# Altium PCB AirBnB-v1.0.PcbDoc (part 4 of 6)
Units mil, origin at the board's own origin, x right, y up, seen from the top; angles counter-clockwise.
Board outline 3937 x 3937 mil, 4 copper layers (Top Layer, Signal + GND, Signal + 3v3, Bottom Layer), stack 62.417 mil thick; 240 components, 168 nets, 829 pads, 395 vias.
Unrouted connection lines stored in the file: 6.
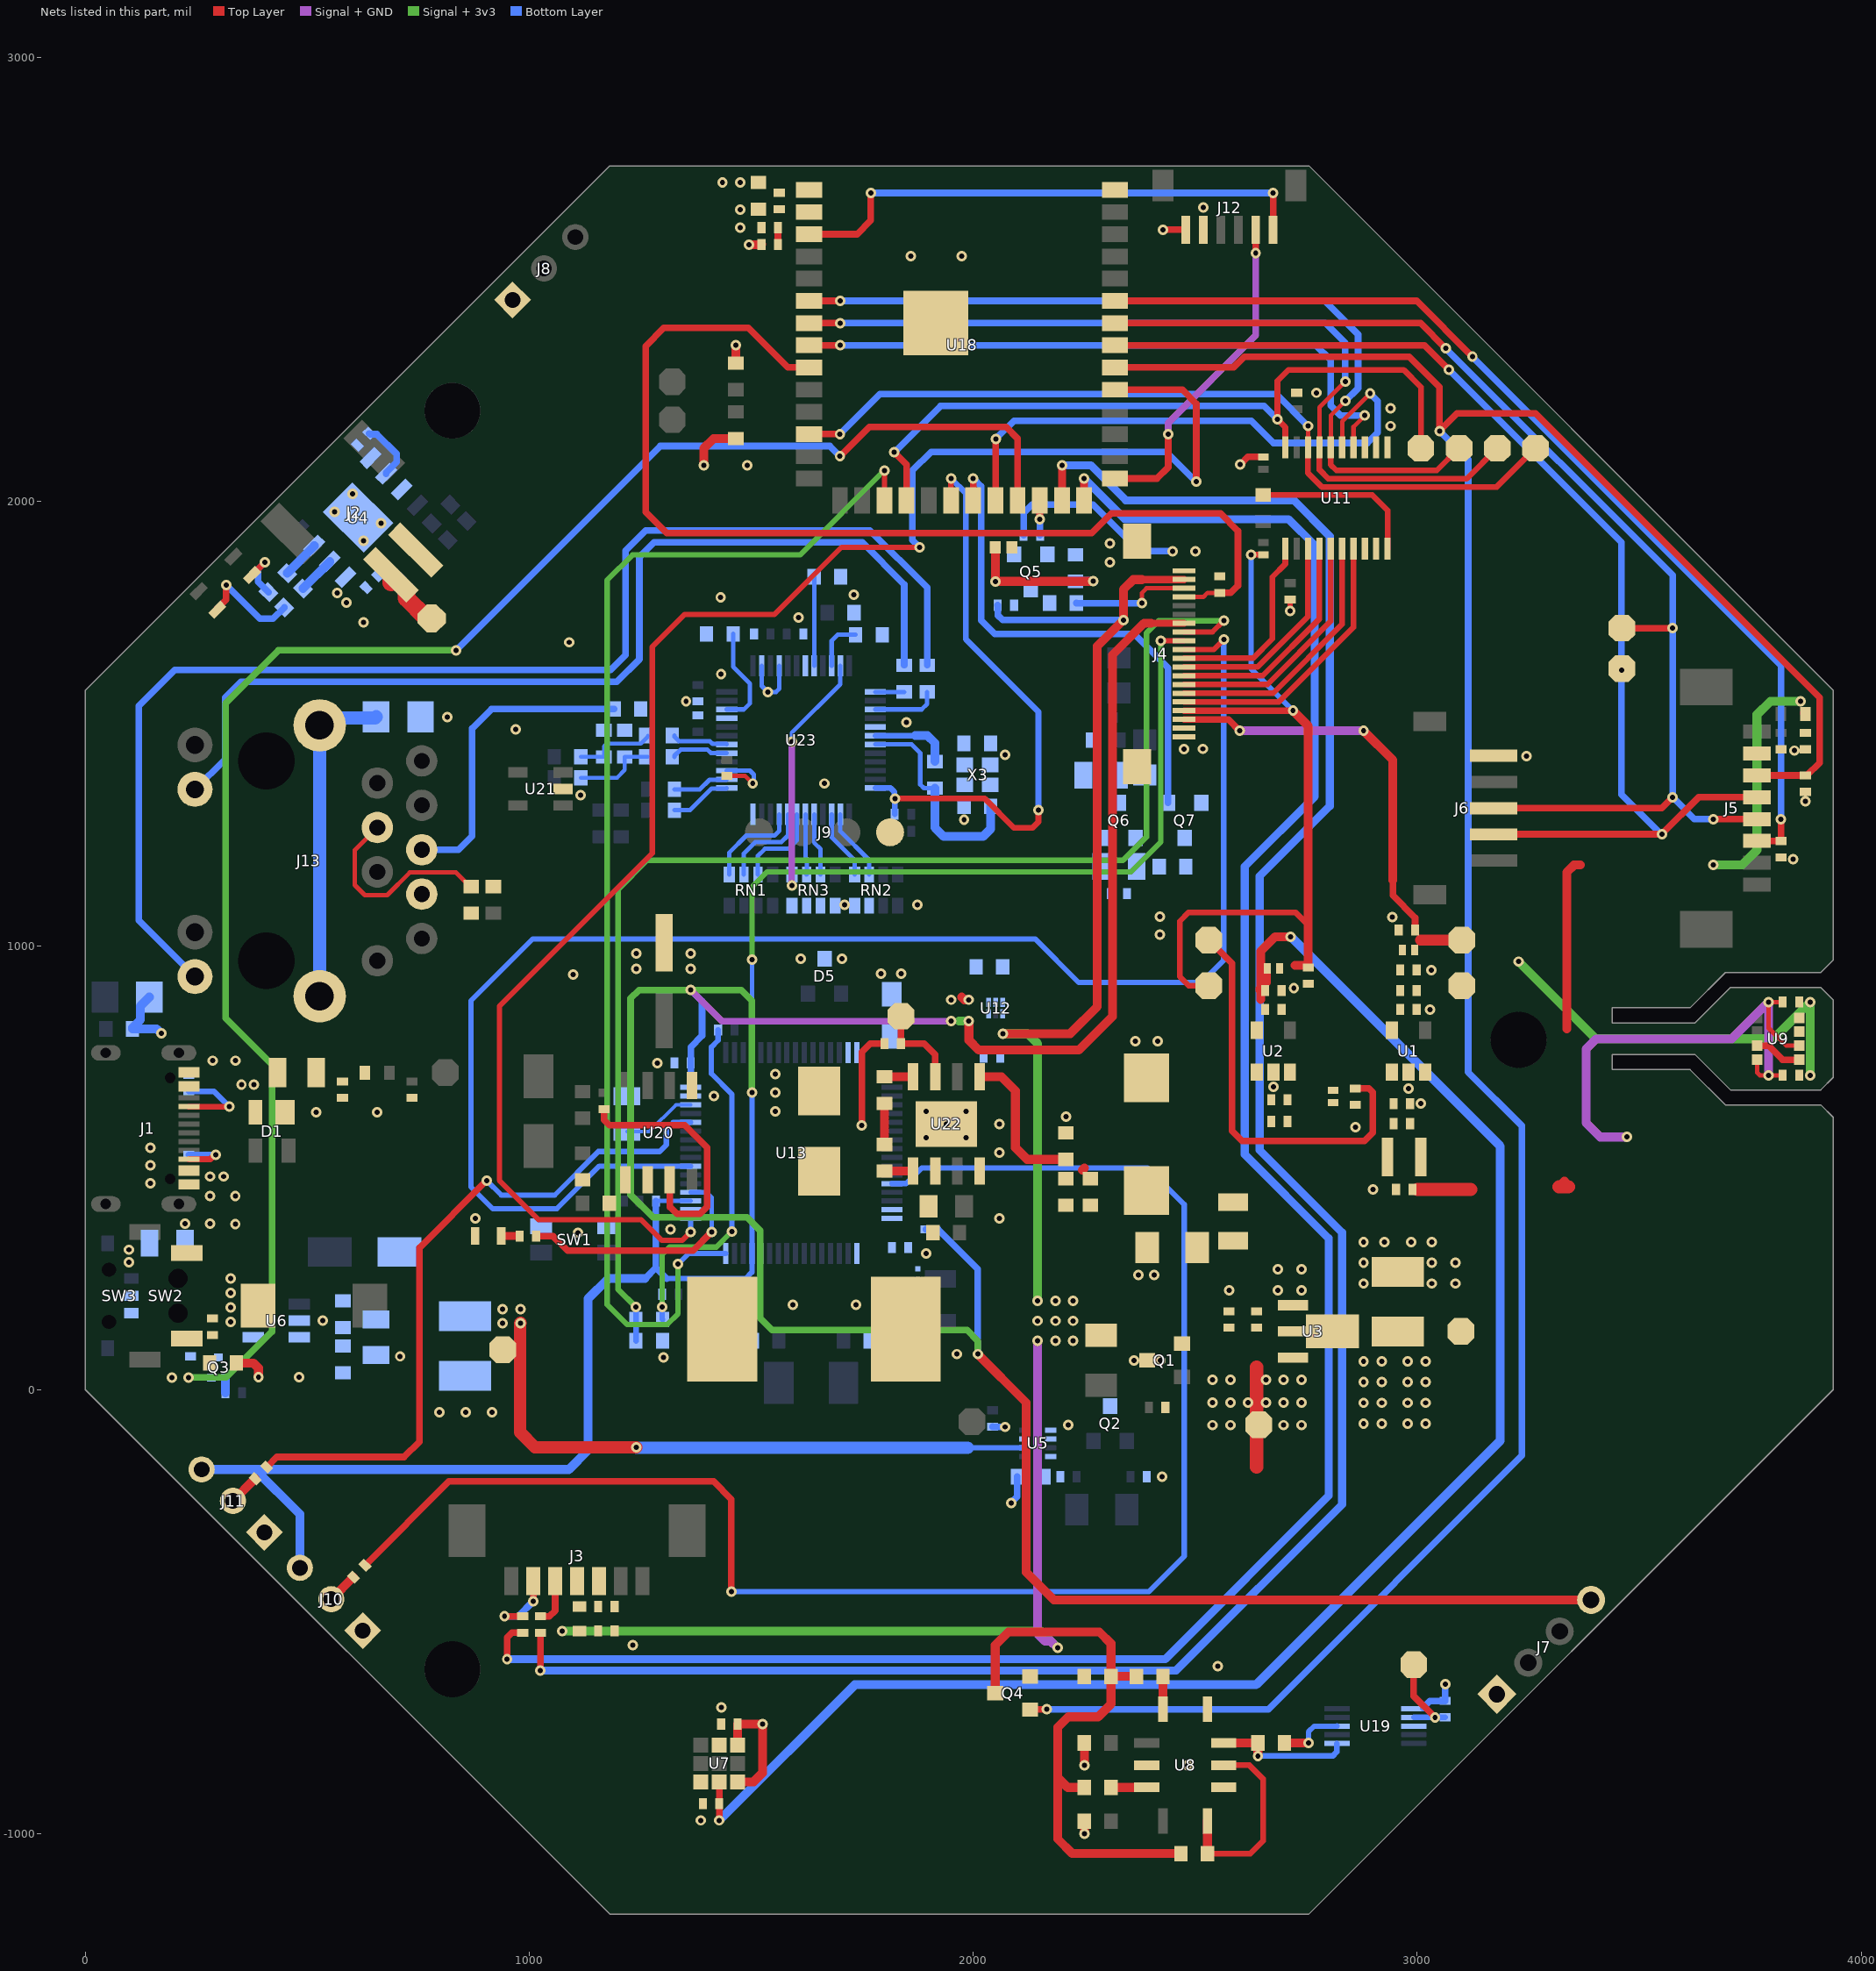
[diagram p4: the nets of this part, all layers, seen from the top]

## Part data (continued)
R67: library part RC0603FR-0712K4L, "RES SMD 12.4K OHM 1% 1/10W 0603", Case Code (Imperial)=0603, Case Code (Metric)=1608, LCSC Part Number=C137798, Manufacturer=Yageo, Max Operating Temperature=155°C, Max Power Dissipation=100mW, Min Operating Temperature=-55°C, Package Quantity=1, Resistance=12.4kR, Resistor Type="Thick Film", Supplier Part Number 1=311-12.4KHRCT-ND, Temperature Coefficient=100ppm/°C, Tolerance=1%, Voltage Rating=50V, Working Voltage=75V, Case/Package=0603, Category="Chip SMD Resistors", ComponentLink1Description=https://datasheet.ciiva.com/2454/pyu-r-int-thick-7-2454069.pdf?src-supplier=Digi-Key, ComponentLink1URL=https://datasheet.ciiva.com/2454/pyu-r-int-thick-7-2454069.pdf?src-supplier=Digi-Key, ComponentLink2Description=https://datasheet.ciiva.com/2454/pyu-r-int-thick-7-2454070.pdf?src-supplier=Digi-Key, ComponentLink2URL=https://datasheet.ciiva.com/2454/pyu-r-int-thick-7-2454070.pdf?src-supplier=Digi-Key, ComponentLink3Description=https://datasheet.ciiva.com/2454/pyu-r-int-thick-7-2454071.pdf?src-supplier=Digi-Key, ComponentLink3URL=https://datasheet.ciiva.com/2454/pyu-r-int-thick-7-2454071.pdf?src-supplier=Digi-Key, Construction=Rectangular, Depth=0.8mm, Features="Moisture Resistant", Height=0.022inch, Lead Free="Lead Free", Length=0.063inch, Manufacturer Part Number=RC0603FR-0712K4L, Military Standard=Not, Number of Terminations=2, Packaging="Tape and Reel", Power Rating=100mW, Pricing 1="1=0.10000, 10=0.02400, 100=0.00970, 1000=0.00436, 2500=0.00378 (USD)", RoHS=Yes, RoHS Compliant=Yes, Series=RC, Stock 1=494008, Supplier 1=Digi-Key, Technology="THICK FILM", Termination=SMD/SMT, Voltage Rating (DC)=50V, Width=0.031inch
RN1 RN2 RN3: library part YC164-FR-0710KL, "RES ARRAY 4 RES 10K OHM 1206", Case Code (Imperial)=1206, Case Code (Metric)=3216, LCSC Part Number=C110924, Manufacturer=Yageo, Max Operating Temperature=155°C, Min Operating Temperature=-55°C, Number of Resistors=4, Power Per Element=62.5mW, Resistance Tolerance=1%, Supplier Part Number 1=5054288, Temperature Coefficient=200ppm/°C, Voltage Rating=50V, Category="Resistor Arrays", Circuit Type=Isolated, ComponentLink1Description=http://www.farnell.com/datasheets/2167431.pdf?src-supplier=Farnell, ComponentLink1URL=http://www.farnell.com/datasheets/2167431.pdf?src-supplier=Farnell, ComponentLink2Description=https://media.digikey.com/pdf/Data%20Sheets/Yageo%20PDFs/YC102-358,TC122-164_Series_DS.pdf?src-supplier=Digi-Key, ComponentLink2URL=https://media.digikey.com/pdf/Data%20Sheets/Yageo%20PDFs/YC102-358,TC122-164_Series_DS.pdf?src-supplier=Digi-Key, ComponentLink3Description=http://www.farnell.com/datasheets/2167431.pdf?src-supplier=Element14, ComponentLink3URL=http://www.farnell.com/datasheets/2167431.pdf?src-supplier=Element14, ComponentLink4Description=http://www.farnell.com/datasheets/443424.pdf?src-supplier=Element14, ComponentLink4URL=http://www.farnell.com/datasheets/443424.pdf?src-supplier=Element14, ComponentLink5Description=http://www.farnell.com/datasheets/2167431.pdf?src-supplier=Newark, ComponentLink5URL=http://www.farnell.com/datasheets/2167431.pdf?src-supplier=Newark, Height=0.028inch, Item Type="Resistor Array", Lead Free="Lead Free", Length=0.126inch, Manufacturer Part Number=YC164-FR-0710KL, Mounting Technology="Surface Mount", Number of Circuits=4, Number of Elements=4, Packaging="Tape and Reel", Pins=8, Pricing 1="5000=0.0101, 20000=0.0095, 50000=0.0092, 125000=0.0089, 200000=0.0085 (USD)", Reach SVHC Compliant=Unknown, RoHS=Yes, RoHS Compliant=Yes, Series=YC164, Stock 1=25000, Supplier 1="Future Electronics", Tolerance=1%, Width=0.063inch
SB1 SB2 SB5 SB6: "Solder Bridge ON", Item Type="Solder Bridge", Manufacturer Part Number="Solder Bridge 0402"
SB3 SB4: "Solder Bridge ON", Manufacturer Part Number="Solder Bridge", Item Type="Solder Bridge"
SW1: "3mm 2mm Round Button 50mA Top3.65mm SPST 12V SMD Tactile Switches", LCSC Part Number=C318893, Manufacturer=XKB, ComponentLink1Description=LCSC, ComponentLink1URL=https://lcsc.com/product-detail/Tactile-Switches_XKB-Connectivity-TS-1185EC-C-D-B_C318893.html, Manufacturer Part Number=TS-1185EC-C-D-B
SW2: "50mA 100MΩ 100000 Times 260gf@±50gf 12V Surface Mount SPST SMD Tactile Switches ROHS", LCSC Part Number=C5381384, Manufacturer="ROCPU Switch", Package=SMD, ComponentLink1Description=LCSC, ComponentLink1URL=https://www.lcsc.com/product-detail/Tactile-Switches_ROCPU-Switches-TP12422673_C5381384.html, Item Type="Tactile Switch", Manufacturer Part Number=TP12422673
SW3: "Surface Mount 1A SPDT 6V Black 10000次 SMD Slide Switches ROHS", LCSC Part Number=C778185, Manufacturer=G-Switch, Package=SMD, ComponentLink1Description=LCSC, ComponentLink1URL=https://www.lcsc.com/product-detail/Slide-Switches_G-Switch-MK-11C04-G013_C778185.html, Item Type="Slide Switche", Manufacturer Part Number=MK-11C04-G013
U1: "300mA 80dB@(1kHz) 305mV@(300mA) Fixed 3.3V~3.3V Positive 1 5.5V SOT-25-5 Linear Voltage Regulators (LDO) ROHS", LCSC Part Number=C69841, Manufacturer="Torex Semicon", Package=SOT-25-5, ComponentLink1Description=LCSC, ComponentLink1URL=https://www.lcsc.com/product-detail/Linear-Voltage-Regulators-LDO_Torex-Semicon-XC6228D332VR-G_C69841.html, Item Type=IC, Manufacturer Part Number=XC6228D332VR-G
U2: "300mA 80dB@(1kHz) 410mV@(300mA) Fixed 1.8V~1.8V Positive 1 5.5V SOT-25-5 Linear Voltage Regulators (LDO) ROHS", LCSC Part Number=C216644, Manufacturer="Torex Semicon", Package=SOT-25-5, ComponentLink1Description=LCSC, ComponentLink1URL=https://www.lcsc.com/product-detail/Linear-Voltage-Regulators-LDO_Torex-Semicon-XC6228D182VR-G_C216644.html, Item Type=IC, Manufacturer Part Number=XC6228D182VR-G
U3: "75dB@(120Hz) 1A Fixed 3.3V~3.3V Positive 15V SOT-89-3 Linear Voltage Regulators (LDO) ROHS", LCSC Part Number=C81768, Manufacturer=UTC, Package=SOT-89-3, ComponentLink1Description=LCSC, ComponentLink1URL=https://www.lcsc.com/product-detail/Linear-Voltage-Regulators-LDO_UTC-Unisonic-Tech-LD1117AG-33-AB3-A-R_C81768.html, Item Type=IC, Manufacturer Part Number=LD1117AG-33-AB3-A-R
U4: "ESOP-8 Battery Management ICs ROHS", LCSC Part Number=C16581, Manufacturer=TOPPOWER, Package=ESOP-8, ComponentLink1Description=LCSC, ComponentLink1URL=https://www.lcsc.com/product-detail/Battery-Management-ICs_TOPPOWER-Nanjing-Extension-Microelectronics-TP4056-42-ESOP8_C16581.html, Item Type=Mosfet, Manufacturer Part Number=TP4056-42-ESOP8
U5: "1.6-V TO 5.5-V, 40-M, 2.5-A, LOW", LCSC Part Number=C3235557, Manufacturer="Texas Instruments", Supplier Part Number 1=595-TPS2116DRLR, Category="Voltage Supervisors", ComponentLink1Description=LCSC, ComponentLink1URL=https://www.lcsc.com/product-detail/Power-Distribution-Switches_Texas-Instruments-TPS2116DRLR_C3235557.html, Item Type=IC, Manufacturer Part Number=TPS2116DRLR, Pricing 1="1=0.9, 10=0.814, 50=0.772, 100=0.634, 1000=0.414, 10000=0.363 (USD)", RoHS=Yes, Stock 1=27931, Supplier 1=Mouser
U6: "boost converterType 1 Boost 28V 2V~24V 1.2MHz SOT-23-6 DC-DC Converters ROHS", LCSC Part Number=C84817, Manufacturer="XI'AN Aerosemi Tech", Package=SOT-23-6, ComponentLink1Description=LCSC, ComponentLink1URL=https://www.lcsc.com/product-detail/DC-DC-Converters_XI-AN-Aerosemi-Tech-MT3608_C84817.html, Item Type=IC, Manufacturer Part Number=MT3608
U7: "Digital Metal-Oxide Multi-Gas Sensor", LCSC Part Number=C3659333, Manufacturer=ScioSense, Supplier Part Number 1=135-ENS160-BGLT, Category=Uncategorized, Item Type="Gas Sensor", Manufacturer Part Number=ENS160-BGLT, Pricing 1="1=12.8, 10=10.46, 50=9.67, 100=8.1, 1000=7.19, 10000=7.19 (USD)", RoHS=No, Stock 1=5978, Supplier 1=Mouser
U8: "CO/NO2/NH3 Triple Gas Sensor Metaloxide Gas Detection Sensor SMD T/R", LCSC Part Number=C3659383, Manufacturer=Amphenol, Category=Sensors, Item Type="(CO) Sensor", Manufacturer Part Number=MICS-6814, Pricing 1="1=10.8025, 10=10.7911 (USD)", RoHS=No, Stock 1=100, Supplier 1="Arrow Electronics", Supplier Part Number 1=MICS-6814
U9: "SENSOR RH PRESSURE TEMP VOC", LCSC Part Number=C125972, Manufacturer="Bosch Sensortec", Max Operating Temperature=85°C, Min Operating Temperature=-40°C, Supplier Part Number 1=7107186, Category=Uncategorized, ComponentLink1Description=https://ae-bst.resource.bosch.com/media/_tech/media/application_notes/BST-BME680-HS000-05.pdf?src-supplier=Digi-Key, ComponentLink1URL=https://ae-bst.resource.bosch.com/media/_tech/media/application_notes/BST-BME680-HS000-05.pdf?src-supplier=Digi-Key, ComponentLink2Description=https://ae-bst.resource.bosch.com/media/_tech/media/product_flyer/BST-BME680-FL000.pdf?src-supplier=Digi-Key, ComponentLink2URL=https://ae-bst.resource.bosch.com/media/_tech/media/product_flyer/BST-BME680-FL000.pdf?src-supplier=Digi-Key, Item Type="Temperature Sensor", Manufacturer Part Number=BME680, Output Type=SPI,I2C, Pricing 1="1=9.84000, 20=8.81000, 125=8.18000, 500=7.71000, 3000=7.09000 (USD)", RoHS=No, Sensor Type=Temperature, Stock 1=64, Supplier 1="Future Electronics"
U11: "IC TRANSLATOR BIDIR 20TSSOP", LCSC Part Number=C17206, Manufacturer="Texas Instruments", Package=20-TSSOP, ComponentLink1Description=LCSC, ComponentLink1URL=https://www.lcsc.com/product-detail/Translators-Level-Shifters_Texas-Instruments-TXS0108EPWR_C17206.html, Item Type=IC, Manufacturer Part Number=TXS0108EPWR
U12: "IC REG LINEAR 3.3V 200MA 6DFN", Case/Package=DFN, Dropout Voltage=150mV, LCSC Part Number=C2971162, Manufacturer=STMicroelectronics, Max Operating Temperature=125°C, Max Output current=200mA, Max Supply Voltage=5.5V, Min Input Voltage=1.9V, Min Operating Temperature=-40°C, Nominal Output Voltage=3.3V, Operating Supply Current=50uA, Package Quantity=6000, Power Supply Rejection Ratio (PSRR)=55dB, Quiescent Current=60uA, Supplier Part Number 1=511-LDK120PU33R, Accuracy=2%, Category="Voltage Regulators - Linear", ComponentLink1Description=https://datasheet.ciiva.com/48475/dm00070790-48475005.pdf?src-supplier=Avnet, ComponentLink1URL=https://datasheet.ciiva.com/48475/dm00070790-48475005.pdf?src-supplier=Avnet, Height=0.45mm, Item Type=IC, Lead Free="Lead Free", Length=1.3mm, Manufacturer Part Number=LDK120PU33R, Mounting Technology="Surface Mount", Number of Outputs=1, Number of Regulators=1, Output Current=200mA, Output Type=Fixed, Output Voltage=3.3V, Packaging="Tape and Reel", Pins=6, Polarity=Positive, Pricing 1="1=0.91, 10=0.752, 50=0.752, 100=0.614, 1000=0.388, 10000=0.343 (USD)", Radiation Hardening=No, Reach SVHC Compliant=No, RoHS=Yes, RoHS Compliant=Yes, Series=-, Stock 1=1169, Supplier 1=Mouser, Width=1.2mm
U13: "IC MCU 32BIT 256KB FLASH 64LQFP", Case/Package=LQFP, Frequency=180MHz, LCSC Part Number=C915971, Manufacturer=STMicroelectronics, Max Supply Voltage=3.6V, Min Supply Voltage=1.7V, Supplier Part Number 1=511-STM32F446RCT6, Category=Microcontrollers, ComponentLink1Description=http://www.farnell.com/datasheets/2309063.pdf?src-supplier=Farnell, ComponentLink1URL=http://www.farnell.com/datasheets/2309063.pdf?src-supplier=Farnell, ComponentLink2Description=http://www.mouser.com/ds/2/389/stm32f446mc-956216.pdf?src-supplier=Mouser, ComponentLink2URL=http://www.mouser.com/ds/2/389/stm32f446mc-956216.pdf?src-supplier=Mouser, ComponentLink3Description=http://www.farnell.com/datasheets/2309063.pdf?src-supplier=Element14, ComponentLink3URL=http://www.farnell.com/datasheets/2309063.pdf?src-supplier=Element14, ComponentLink4Description=http://www.st.com/content/ccc/resource/technical/document/errata_sheet/c3/6b/f8/32/fc/01/48/6e/DM00155929.pdf/files/DM00155929.pdf/jcr:content/translations/en.DM00155929.pdf?src-supplier=Digi-Key, ComponentLink4URL=http://www.st.com/content/ccc/resource/technical/document/errata_sheet/c3/6b/f8/32/fc/01/48/6e/DM00155929.pdf/files/DM00155929.pdf/jcr:content/translations/en.DM00155929.pdf?src-supplier=Digi-Key, ComponentLink5Description=http://www.farnell.com/datasheets/2309063.pdf?src-supplier=Newark, ComponentLink5URL=http://www.farnell.com/datasheets/2309063.pdf?src-supplier=Newark, ComponentLink6Description=http://www.st.com/st-web-ui/static/active/en/resource/technical/document/datasheet/DM00141306.pdf?src-supplier=Avnet, ComponentLink6URL=http://www.st.com/st-web-ui/static/active/en/resource/technical/document/datasheet/DM00141306.pdf?src-supplier=Avnet, Item Type=IC, Lead Free="Lead Free", Manufacturer Part Number=STM32F446RCT6, Memory Size=256KB, Number of I/Os=50, Pins=64, Pricing 1="1=10.62, 10=9.6, 50=8.98, 100=7.95, 1000=6.28, 10000=6.28 (USD)", RAM Size=128KB, Reach SVHC Compliant=No, RoHS=Yes, RoHS Compliant=Yes, Stock 1=998, Supplier 1=Mouser
U18: "SMD MODULE, ESP32-S3R8 WITH 3.3V", LCSC Part Number=C2913202, Manufacturer="Espressif Systems", Supplier Part Number 1=1965-ESP32-S3-WROOM-1-N16R8CT-ND, Category=Uncategorized, ComponentLink1Description=LCSC, ComponentLink1URL=https://www.lcsc.com/product-detail/WiFi-Modules_Espressif-Systems-ESP32-S3-WROOM-1-N16R8_C2913202.html, Item Type=Module, Manufacturer Part Number=ESP32-S3-WROOM-1-N16R8, Pricing 1="1=4.29000 (USD)", RoHS=No, Stock 1=423, Supplier 1=Digi-Key
U19: "IC ADC 12BIT SIGMA-DELTA 10VSSOP", Case/Package=VSSOP, LCSC Part Number=C193969, Manufacturer="Texas Instruments", Max Operating Temperature=125°C, Max Supply Voltage=5.5V, Min Operating Temperature=-40°C, Min Supply Voltage=2V, Operating Supply Voltage=3.3V, Package Quantity=2500, Power Dissipation=900uW, Supplier Part Number 1=296-41185-1-ND, Category="Analog to Digital Converters (ADCs)", ComponentLink1Description=https://datasheet.ciiva.com/14260/sbas473c-14260076.pdf?src-supplier=Avnet, ComponentLink1URL=https://datasheet.ciiva.com/14260/sbas473c-14260076.pdf?src-supplier=Avnet, ComponentLink2Description=https://datasheet.ciiva.com/6662/ads1013-6662716.pdf?src-supplier=Digi-Key, ComponentLink2URL=https://datasheet.ciiva.com/6662/ads1013-6662716.pdf?src-supplier=Digi-Key, Contact Plating=Gold, Conversion Rate=3.3KS/s, Integral Nonlinearity (INL)=0.5LSB, Interface=I2C, Item Type=IC, Lead Free="Lead Free", Manufacturer Part Number=ADS1015IDGSR, Max Supply Voltage (DC)=5.5V, Min Supply Voltage (DC)=2V, Number of A/D Converters=1, Number of Bits=12, Number of Converters=1, Number of Elements=1, Number of Inputs=4, Number of Pins=10, Packaging="Tape and Reel", Polarity=Bipolar, Pricing 1="1=3.09000, 10=2.77500, 25=2.62360, 100=2.27370, 250=2.15712, 500=1.93556, 1000=1.65000 (USD)", Radiation Hardening=No, Reach SVHC Compliant=Yes, Resolution=12b, RoHS=Yes, RoHS Compliant=Yes, Sampling Rate=3.3KS/s, Series=-, Supplier 1=Digi-Key, Supply Type=Single
U20: "IC POE CNTRL 1 CHANNEL 8SOIC", Case/Package=D, LCSC Part Number=C2867397, Manufacturer="Texas Instruments", Max Operating Temperature=85°C, Max Power Dissipation=12.95W, Max Supply Voltage=57V, Min Current Limit=405mA, Min Operating Temperature=-40°C, Min Supply Voltage=0V, Operating Supply Current=240uA, Output Current=450mA, Package Quantity=2500, Power Dissipation=13W, Supplier Part Number 1=595-TPS2375DR, Category="Interface ICs", ComponentLink1Description=https://datasheet.ciiva.com/1943/tps2375-1943071.pdf?src-supplier=Digi-Key, ComponentLink1URL=https://datasheet.ciiva.com/1943/tps2375-1943071.pdf?src-supplier=Digi-Key, ComponentLink2Description=https://datasheet.ciiva.com/1943/tps2375-1943070.pdf?src-supplier=Digi-Key, ComponentLink2URL=https://datasheet.ciiva.com/1943/tps2375-1943070.pdf?src-supplier=Digi-Key, ComponentLink3Description=https://datasheet.ciiva.com/1943/tps2375-1943072.pdf?src-supplier=Digi-Key, ComponentLink3URL=https://datasheet.ciiva.com/1943/tps2375-1943072.pdf?src-supplier=Digi-Key, ComponentLink4Description=https://datasheet.ciiva.com/14248/tps2375-14248055.pdf?src-supplier=Avnet, ComponentLink4URL=https://datasheet.ciiva.com/14248/tps2375-14248055.pdf?src-supplier=Avnet, Height=1.58mm, Item Type=IC, Lead Free="Lead Free", Length=5mm, Manufacturer Part Number=TPS2375DR, Number of Channels=1, Packaging="Tape and Reel", Pins=8, Pricing 1="1=2.94, 10=2.65, 50=2.5, 100=2.13, 1000=1.45, 10000=1.29 (USD)", Radiation Hardening=No, RoHS=Yes, RoHS Compliant=Yes, Series=-, Stock 1=12566, Supplier 1=Mouser, Weight=0.002561oz
U21: "TVS DIODE 5.5VWM 8.5VC SOT23-5", Breakdown Voltage=5.5V, Case/Package=SOT-23, Clamping Voltage=7.8V, Clamping Voltage-Max=8V, LCSC Part Number=C10675, Leakage Current=100nA, Manufacturer=Littelfuse, Max Operating Temperature=85°C, Max Power Dissipation=225mW, Min Operating Temperature=-40°C, Power Line Protection=No, Supplier Part Number 1=3283009, Voltage Rating (DC)=5V, Category="TVS Diodes", ComponentLink1Description=https://datasheet.ciiva.com/15143/getdatasheetpartid-152299-15143806.pdf?src-supplier=Verical, ComponentLink1URL=https://datasheet.ciiva.com/15143/getdatasheetpartid-152299-15143806.pdf?src-supplier=Verical, ComponentLink2Description=https://datasheet.ciiva.com/4509/sp05x-leadfree-4509638.pdf?src-supplier=Mouser, ComponentLink2URL=https://datasheet.ciiva.com/4509/sp05x-leadfree-4509638.pdf?src-supplier=Mouser, ComponentLink3Description=https://datasheet.ciiva.com/22697/1911798-22697943.pdf?src-supplier=Element14, ComponentLink3URL=https://datasheet.ciiva.com/22697/1911798-22697943.pdf?src-supplier=Element14, ComponentLink4Description=https://datasheet.ciiva.com/8062/littefuse-spa-sp050x-8062425.pdf?src-supplier=Element14, ComponentLink4URL=https://datasheet.ciiva.com/8062/littefuse-spa-sp050x-8062425.pdf?src-supplier=Element14, ComponentLink5Description=https://datasheet.ciiva.com/332/sp05xxba-332619.pdf?src-supplier=Digi-Key, ComponentLink5URL=https://datasheet.ciiva.com/332/sp05xxba-332619.pdf?src-supplier=Digi-Key, ComponentLink6Description=https://datasheet.ciiva.com/332/sp05xxba-332620.pdf?src-supplier=Digi-Key, ComponentLink6URL=https://datasheet.ciiva.com/332/sp05xxba-332620.pdf?src-supplier=Digi-Key, ComponentLink7Description=https://datasheet.ciiva.com/16393/sp05xxba-16393404.pdf?src-supplier=Future+Electronics, ComponentLink7URL=https://datasheet.ciiva.com/16393/sp05xxba-16393404.pdf?src-supplier=Future+Electronics, ComponentLink8Description=https://datasheet.ciiva.com/332/sp05xxba-332621.pdf?src-supplier=Digi-Key, ComponentLink8URL=https://datasheet.ciiva.com/332/sp05xxba-332621.pdf?src-supplier=Digi-Key, ComponentLink9Description=https://datasheet.ciiva.com/1268/526672-1268494.pdf?src-supplier=Element14, ComponentLink9URL=https://datasheet.ciiva.com/1268/526672-1268494.pdf?src-supplier=Element14, Depth=1.75mm, Diode Type=ZENER, Direction=Unidirectional, ESD Protection=Yes, Height=1.3mm, Item Type="TVS Diode", Lead Free="Lead Free", Length=3.05mm, Manufacturer Part Number=SP0504BAHTG, Max Reverse Leakage Current=100nA, Mounting Technology="Surface Mount", Number of Channels=4, Number of Elements=4, Number of Unidirectional Channels=4, Packaging="Tape and Reel", Peak Pulse Power=225mW, Pins=5, Polarity=Bidirectional,Unidirectional, Power Dissipation=225mW, Pricing 1="1=0.78, 15=0.685, 75=0.625, 300=0.575, 1500=0.52 (USD)", Radiation Hardening=No, Reach SVHC Compliant=Unknown, Reverse Standoff Voltage=5.5V, RoHS=Yes, RoHS Compliant=Yes, Series="SP05, SPA®", Stock 1=1611, Supplier 1="Future Electronics", Termination=SMD/SMT, Width=1.75mm, Working Voltage=5.5V
U22: "Step-down type SOIC-8-EP DC-DC Converters ROHS", LCSC Part Number=C329267, Manufacturer=XDS, Package=SOIC-8-EP, ComponentLink1Description=LCSC, ComponentLink1URL=https://www.lcsc.com/product-detail/DC-DC-Converters_XDS-TX4138_C329267.html, Item Type=IC, Manufacturer Part Number=TX4138
U23: "SPI LQFP-48(7x7) Ethernet ICs ROHS", LCSC Part Number=C32843, Manufacturer=WIZNET, Package=LQFP-48(7x7), ComponentLink1Description=LCSC, ComponentLink1URL=https://www.lcsc.com/product-detail/Ethernet-ICs_WIZNET-W5500_C32843.html, Item Type=IC, Manufacturer Part Number=W5500
X1: library part DXTF321532768C10F, "32.768kHz 7pF ±10ppm SMD3215-2P Crystals ROHS", LCSC Part Number=C5830643, Manufacturer=Shenzhen, Package=SMD3215-2P, ComponentLink1Description=LCSC, ComponentLink1URL=https://www.lcsc.com/product-detail/Crystals_Shenzhen-SCTF-Elec-DXTF321532768C10F_C5830643.html, Item Type=Crystal, Manufacturer Part Number=DXTF321532768C10F
X2: library part X50328MSB2GI, "8MHz 20pF ±10ppm ±50ppm SMD5032-2P Crystals ROHS", LCSC Part Number=C115962, Manufacturer="Yangxing Tech", Package=SMD5032-2P, ComponentLink1Description=LCSC, ComponentLink1URL=https://www.lcsc.com/product-detail/Crystals_Yangxing-Tech-X50328MSB2GI_C115962.html, Item Type=Crystal, Manufacturer Part Number=X50328MSB2GI
X3: library part Q22FA12800090, "CRYSTAL 25.0000MHZ 12PF SMD", LCSC Part Number=C255883, Manufacturer="Seiko Epson", Package=SMD2016-4P, ComponentLink1Description=LCSC, ComponentLink1URL=https://www.lcsc.com/product-detail/Crystals_Seiko-Epson-Q22FA12800090_C255883.html, Item Type=Crystal, Manufacturer Part Number=Q22FA12800090

## Free pads (board coordinates)
  round 125.98 hole 125.98 unplated: MH(826.77,2204.72) MH1(826.77,-629.92) MH2(3228.35,787.4)

## Via types
v1: diameter 23.62, hole 11.81, Top Layer to Bottom Layer, 392 vias
v2: diameter 23.62, hole 11.81, Top Layer to Bottom Layer, tented top, 3 vias

## Nets (pads, with @x,y where several pads share a name; then routed paths per layer and width w, separated by ;. In a path a pad name is that pad's centre, name@x,y a point inside that pad or via, vN(x,y) a via of type N, cw(c..) or ccw(c..) an arc to the next point about the centre after c; other vN are vias at no path point)
1V8: C12.2 C14.2 C27.1 FB4.1 U2.5 U7.4 | length 3774.2
  Top Layer w15: v1(1427.73,-970) C27.1@1427.73,-932.27 U7.4@1427.73,-883.34
  Top Layer w20: 2645.72,899 2647.52,900.81 2645.72,902.61 ; 2647.17,878.58 2647.17,899 2647.17,916.71 2647.17,987.17 2680,1020 v1(2715,1020) ; C14.2@2655,899 2655,916.71 ; 2659.81,916.71 FB4.1@2659.81,948.44
  Bottom Layer w20: v1@1428.22,-969.51 1733.11,-664.62 2636.89,-664.62 3187.01,-114.51 3187.01,547.99 v1(2715,1020)
1V8_SENSOR: C16.2 FB4.2 FB7.1 J4.17 P2.1 | length 1794.3
  Top Layer w13: P2.1@2530,910 2485,910 2465,930 2465,1055 2485,1075 2725.42,1075 2754.72,1045.7 ; v1(2626,1880.31) FB7.1@2653,1880.31
  Top Layer w14: J4.17@2474.76,1529.05 v1(2719.98,1529.02)
  Top Layer w20: v1(2719.98,1529.02) 2754.36,1494.64 C16.2@2754.36,955.49 ; 2724.42,955.49 C16.2@2745.86,955.49 ; C16.2@2742.36,955.49 C16.2@2754.36,955.49 ; C16.2@2754.36,957.7 C16.2@2754.36,955.49
  Bottom Layer w12: v1(2626,1880.31) 2626,1623 v1(2719.98,1529.02)
3V3: C19.1 C24.1 C28.2 C29.2 C58.2 C59.2 C69.2 FB8.1 J4.1 J12.1 P7.1 Q5.1 Q6.2 R13.2 R20.1 R21.1 R22.1 R23.2 R24.2 R25.2 R36.2 R37.2 R38.2 R40.2 R41.1 R44.2 R55.1 R56.2 U3.2 U7.5 U7.7 U9.2 U9.5 U9.6 U9.8 U18.2 U19.1 U19.8 | length 2669.4
  Top Layer w15: v1@1749,595.52 1749,760.5 1767.71,779.21 R56.2@1800.06,779.21 ; v1(2427.39,2612.3) J12.1@2478.58,2612.3 ; v1(2601.04,2083.14) 2601.27,2083.14 2618.69,2100.56 FB8.1@2653,2100.56 ; U9.2@3765.51,774.5 3791.34,774.5 3822.83,743.01 U9.8@3860,743.01
  Top Layer w20: R40.2@340,60 378.28,60 390,48.28 v1(390,27.99) ; v1(1392.72,2081.81) 1392.72,2119.72 1415,2142 R38.2@1465,2142 ; R37.2@1465,2312 v1(1465,2352) ; U7.5@1469.07,-883.34 1505,-883.34 1525,-863.34 v1(1525,-753.27) C24.1@1469.07,-753.27 U7.7@1469.07,-800.66 ; v1(2249.98,-1000.35) R21.1@2249.98,-971.81 ; v1(2249.98,-845.83) R20.1@2249.98,-795.83 ; R22.1@2700.98,-795.83 v1(2755,-795.83)
  Signal + 3v3 w20: v1(3228.35,964) 3402.1,790.25 3802.25,790.25 v1(3885,873) v1(3885,708)
  Bottom Layer w12: v1(2755,-795.83) 2755,-770.57 2767.85,-757.72 2818.91,-757.72 U19.8@2819,-757.63
  Bottom Layer w15: R13.2@2043.39,-83.43 2043.67,-83.71 2071.72,-83.71 v1(2072,-84) ; R41.1@2113.34,1924 2113.34,1974.34 2132,1993 2269.68,1993 2374.5,1888.18 v1(2449.17,1888.18) ; U19.1@3013.27,-716.67 3013.27,-715.67 3028,-700.94 R44.2@3063,-700.94 v1(3063,-663.44)
  other v1: 2879,-76.33 2920,-76.33 2978,-76.33 3019,-76.33 2879,-29.67 2920,-29.67 2978,-29.67 3019,-29.67 2879,17 2920,17 2978,17 3019,17 2879,63.67 2920,63.67 2978,63.67 3019,63.67 1749,595 2420,1065 3846.45,1195 3874.12,1325 2500,1888.18 1475,2617 1475,2657
  other v2: 2420,1025
3V3_AUD: C42.1 C43.1 C45.2 C47.2 J4.7 J7.4 J10.3 J11.3 R27.1 U12.1 U13.1 U13.13 U13.19 U13.32 U13.48 U13.64 | length 9037.6
  Top Layer w16: 2400.74,1725.9 J4.7@2474.76,1725.9
  Top Layer w20: 1973.91,883.91 1979.82,878 v1(1990,878) ; v1(1990,830.18) 1990,786.98 2012.4,764.58 2237.46,764.58 2313.45,840.57 2313.45,1654.91 2384.44,1725.9 2400.74,1725.9 ; v1(2010,80) 2119.11,-29.11 2119.11,-410.87 2181.82,-473.58 J7.4@3391.42,-473.58
  Signal + GND w15: v1(1363.62,900) 1433.62,830 v1@1950,830
  Signal + 3v3 w15: v1(1501.42,669) 1501.42,875.86 1477.28,900 v1(1363.62,900) 1247,900 1228,881 1228,439 1279,388 1490,388 1520,358 1520,160.71 1546.71,134 1986,134 2010,110 v1(2010,80)
  Signal + 3v3 w20: 1968.09,830.18 v1(1990,830.18)
  Bottom Layer w10: R27.1@1285,425 U13.19@1363.35,425
  Bottom Layer w12: 1309.34,250.01 1487.11,250.01 1501.42,264.32 U13.13@1501.42,306.62 v1(1501.42,669)
  Bottom Layer w15: 1260.67,250.01 1285,274.34 ; R27.1@1285,425 1285,274.34 ; 1309.34,250.01 1285,274.34 ; U13.32@1363.62,680.64 C47.2@1363.62,735.76 1363.62,771.61 1389,796.99 1389,874.62 v1(1363.62,900) ; C45.2@1893.27,361 C45.2@1893.22,360.96 1920.92,360.96 2010,271.87 v1(2010,80) ; C45.2@1893.33,360.98 C45.2@1896.7,360.98
  Bottom Layer w20: J11.3@261.75,-179.75 382.29,-179.75 ; J10.3@483.17,-401.17 483.17,-280.63 382.29,-179.75 ; 1260.67,250.01 1177.67,250.01 1132,204.34 1132,-136.8 1089.05,-179.75 382.29,-179.75 ; J7.4@3390.69,-474.31 J7.4@3391.42,-473.58
  other v1: 1950,830.18 1950,878
3V3_CLEAN: C3.2 C9.2 C10.2 C13.2 FB1.1 FB3.1 P4.1 U1.5 | length 919.9
  Top Layer w15: P4.1@2530,1012.2 2582.42,959.78 2582.42,582.61 2605.36,559.68 2880.81,559.68 2899.82,578.69 2899.82,669.17 2890.59,678.41 C3.2@2860.31,678.41
3V3_SENSOR: C15.2 FB3.2 J4.18 P3.1 | length 1003.2
  Top Layer w15: J4.18@2474.76,1509.36 2574.41,1509.36 v1(2600,1483.77) ; 2945,1147.02 2945,1112.78 2995,1062.78 C15.2@2995,1035
  Top Layer w20: v1(2879,1483.77) 2945,1417.77 2945,1147.02
  Top Layer w25: 3007.5,1012.2 P3.1@3100,1012.2
  Signal + GND w20: v1(2600,1483.77) v1@2878.02,1483.77
5V: C1.2 C17.2 C18.2 C26.2 C31.2 C36.2 D2.1 FB5.2 FB6.2 J4.2 L1.1 P6.1 Q1.2 Q4.2 R17.1 R42.1 U3.3 U5.2 U5.7 U12.4 U12.6 | length 5477.7
  Top Layer w16: 2380,1824.32 J4.2@2474.76,1824.32
  Top Layer w20: v1(2066.5,801.81) 2218.15,801.81 2279.26,862.91 2279.26,1674.58 v1@2337.75,1733.07 ; v1(2338,1733.32) 2338,1802.02 2360.3,1824.32 2380,1824.32 ; 3318.95,456.73 3331.34,469.12 ; 3336.5,812.75 3336.5,1164.89 3353,1181.39 3366.78,1181.39 3367.37,1181.98 ; v1@3863.4,1548.97 v1(3863.4,1549.95) ; FB6.2@3872.31,1523.31 FB6.2@3874.12,1521.5
  Top Layer w30: 2638,-174.32 2638,-79 2638,50.53 ; 3000.6,451 3120,451 ; 3318.95,456.73 3331.34,456.73 3340.24,456.73
  Signal + GND w20: v1(2145,110) 2145,-550 2161.1,-566.1 2174.01,-566.1 2189.02,-581.11 v1(2190,-581.11)
  Signal + 3v3 w20: v1(1074,-543.53) 2152.42,-543.53 v1(2190,-581.11) ; v1(2066.5,801.81) 2122.19,801.81 2145,779 v1(2145,200) ; v1(3667,1181.98) 3731.98,1181.98 3765,1215 3765,1520 3794.95,1549.95 v1(3863.4,1549.95)
  Bottom Layer w15: R42.1@2054.76,1766.5 2055.35,1765.91 2055.35,1743.77 2065.8,1733.32 v1(2338,1733.32)
  other v1: 2539,-80 2579,-80 2699,-80 2739,-80 2539,-29 2579,-29 2619,-29 2659,-29 2699,-29 2739,-29 2539,22 2579,22 2659,22 2699,22 2739,22 2185,110 2225,110 2145,155 2185,155 2225,155 2185,200 2225,200
5V_BOOST: C22.2 C23.1 D4.1 P10.1 R15.2 U5.6 | length 1401.3
  Top Layer w28: P10.1@940,90 P10.1@942.5,92.5 ; v1(980,150) 979,149 979,-96 1013,-130 v1(1241,-130)
  Bottom Layer w12: 1987,-130.68 U5.6@2116,-130.68
  Bottom Layer w28: v1(1241,-130) 1241.68,-130.68 1987,-130.68
  other v1: 940,150 940,181 980,181
5V_PoE: D8.1 Q1.3 Q2.3
  other v1: 2362,66 2421.26,66 2372,258 2407,258
W5500_RST: R69.2 U18.19 U23.37 | length 1422.6
  Top Layer w13: v1(1765.43,1296) 1765.43,1345.82 1784.62,1365 2044.89,1365 v1(2105,1304.89) ; U18.19@1899.66,2002.79 v1(1899.66,2052)
  Bottom Layer w13: U23.37@1720.27,1295.68 1720.27,1295.8 1720.47,1296 v1(1765.43,1296) 1804.43,1257 R69.2@1822.9,1257 ; v1(1899.66,2052) 1952,1999.66 1952,1667 2105,1514 v1(2105,1304.89)
#VBUS: D1.2 F1.1 J1.A4/B9 J1.B4/A9
  other v1: 280.62,480 311.1,480 351.5,687 379.5,687
A1: J4.11 U11.1 | length 432.3
  Top Layer w13: J4.11@2474.76,1647.16 2630,1647.16 2673.75,1690.91 2673.75,1830.34 2702.74,1859.34 U11.1@2702.74,1894.09
A2: J4.12 U11.3 | length 479.1
  Top Layer w13: J4.12@2474.76,1627.47 2640.15,1627.47 2753.93,1741.24 U11.3@2753.93,1894.09
A3: J4.13 U11.4 | length 516.2
  Top Layer w13: J4.13@2474.76,1607.79 2651.68,1607.79 2779.52,1735.63 U11.4@2779.52,1894.09
A4: J4.14 U11.5 | length 552.8
  Top Layer w13: J4.14@2474.76,1588.1 2662.56,1588.1 2805.11,1730.64 U11.5@2805.11,1894.09
A5: J4.15 U11.6 | length 590.6
  Top Layer w13: J4.15@2474.76,1568.42 2675.36,1568.42 2830.7,1723.75 U11.6@2830.7,1894.09
A6: J4.16 U11.7 | length 628.4
  Top Layer w13: J4.16@2474.76,1548.73 2688.16,1548.73 2856.29,1716.86 U11.7@2856.29,1894.09
A7: U11.8
A8: U11.9
ADS_RDY: P19.1 R44.1 U19.2 | length 209.6
  Top Layer w15: P19.1@2992,-619 2992,-689.94 v1(3040,-737.94)
  Bottom Layer w13: U19.2@2992.23,-737.94 v1(3040,-737.94) R44.1@3063,-737.94
B1: P18.1 U11.20 U18.18 | length 1682.7
  Top Layer w13: U11.20@2702.74,2122.43 2702.74,2167.26 v1(2685,2185) 2685,2271.65 2710.14,2296.79 2969.1,2296.79 3008,2257.89 P18.1@3008,2120
  Top Layer w15: v1(1822,2111) 1849.83,2083.17 1849.83,2002.96 U18.18@1849.66,2002.79
  Bottom Layer w15: v1(1822,2111) 1926.44,2215.44 2654.56,2215.44 v1(2685,2185)
B2: P17.1 U11.18 U18.12 | length 1857.8
  Top Layer w10: U11.18@2753.93,2122.43 v1(2753.93,2170)
  Top Layer w13: U11.18@2753.93,2122.43 2753.93,2063.95 2784.87,2033 3179,2033 P17.1@3266,2120
  Top Layer w15: U18.12@1629.97,2152 v1(1699.66,2152)
  Bottom Layer w15: v1(1699.66,2152) 1789.34,2241.68 2682.25,2241.68 v1(2753.93,2170)
B3: P16.1 U11.17 U18.7 | length 1973.4
  Top Layer w10: U11.17@2779.52,2122.43 2779.52,2211.73 v1(2837.78,2270)
  Top Layer w13: U11.17@2779.52,2122.43 2779.52,2071.46 2799.47,2051.5 3111.5,2051.5 P16.1@3180,2120
  Top Layer w15: U18.7@1629.97,2402 v1(1700,2402)
  Bottom Layer w15: v1(1700,2402) 2793,2402 2837.78,2357.22 v1(2837.78,2270)
B4: P15.1 U11.16 U18.6 | length 1902.5
  Top Layer w10: U11.16@2805.11,2122.43 2805.11,2193.82 v1(2837.78,2226.5)
  Top Layer w13: U11.16@2805.11,2122.43 2805.11,2082.8 2817.9,2070.01 3044.01,2070.01 P15.1@3094,2120
  Top Layer w15: U18.6@1629.97,2452 v1(1700,2452) ; P15.1@3094,2120 P15.1@3094.5,2120.5
  Bottom Layer w15: v1(1700,2452) 2790.76,2452 2866.66,2376.1 2866.66,2255.38 v1(2837.78,2226.5)
B5: U11.15 U18.22 | length 1277.5
  Top Layer w10: U11.15@2830.7,2122.43 2830.7,2180.35 v1(2893.82,2243.48)
  Top Layer w15: U18.22@2049.66,2002.79 2050.15,2003.28 2050.15,2129.51 v1@2050.65,2130
  Bottom Layer w15: v1(2050.65,2141) 2091.65,2182 2626,2182 2676,2132 2887.63,2132 2910.66,2155.03 2910.66,2226.64 v1(2893.82,2243.48)
B6: U11.14 U18.8 | length 1459.7
  Top Layer w10: U11.14@2856.29,2122.43 2856.29,2168.23 v1(2881.88,2193.82)
  Top Layer w15: U18.8@1629.97,2352 v1(1700,2352)
  Bottom Layer w15: v1(1700,2352) 2771.83,2352 2805,2318.83 2805,2216 2827.17,2193.82 v1(2881.88,2193.82)
B7: U11.13
B8: U11.12
BATT: C20.2 C21.2 J2.2 P8.1 SW3.C U4.5 | length 147.7
  Top Layer w39.37: J2.2@688.4,1817.33 J2.2@688.4,1835 ; J2.2@697.24,1826.17 723.2,1800.21 723.2,1782.53 766.27,1739.45 777.55,1739.45 P8.1@780,1737
  other v1: 98,286.96 98,315.05 588.21,1772.55 567.11,1793.74
BOOT0: R30.2 U13.60 | length 3681
  Top Layer w15: R30.2@629.87,-395.88 819.14,-206.62 1414.83,-206.62 1455,-246.8 v1(1455,-455)
  Bottom Layer w12: v1(1455,-455) 2395,-455 2475,-375 2475,416.96 2392.43,499.53 1884.03,499.53 1848.69,464.2 1816.47,464.2 U13.60@1816.38,464.1
BOOT1: R31.2 U13.28 | length 1580.5
  Top Layer w15: R31.2@408.45,-174.46 431.31,-151.6 718.29,-151.6 752.41,-117.49 752.41,319.41 v1(904,471)
  Bottom Layer w12: v1(904,471) 937,438 1057.21,438 1155.46,536.25 1293.32,536.25 1308.49,551.43 1308.49,586.37 1324.02,601.9 U13.28@1363.62,601.9
CH2O_5V: C25.2 FB5.1 J3.4
CH2O_RX: SB6.1 U18.25 | length 5117.1
  Top Layer w15: v1(1024.79,-632.73) SB6.1@1024.79,-547.46
  Top Layer w18: U18.25@2199.66,2002.79 v1(2199.66,2081.69)
  Bottom Layer w18: v1(1024.79,-632.73) 2456.46,-632.73 2830.59,-258.6 2830.59,353.92 2645,539.51 2645,1156.45 2803,1314.45 2803,1921.48 2721.7,2002.79 2343.52,2002.79 2264.62,2081.69 v1(2199.66,2081.69)
CH2O_TX: SB5.1 U18.26 | length 5004.2
  Top Layer w15: v1@950,-605.48 950,-558 960.54,-547.46 SB5.1@985,-547.46
  Top Layer w18: U18.26@2249.66,2002.79 v1(2249.66,2052)
  Bottom Layer w18: v1(950,-607) 950.08,-606.92 2432.3,-606.92 2800.3,-238.92 2800.3,340.94 2611.3,529.94 2611.3,1178.1 2769,1335.81 2769,1901 2710,1960 2341.66,1960 v1(2249.66,2052)
CO: R22.2 U8.H U19.6 | length 306.5
  Top Layer w20: U8.H@2563.98,-795.83 R22.2@2640.98,-795.83 v1(2640.98,-825)
  Bottom Layer w13: v1(2640.98,-825) 2809.34,-825 2818.96,-815.38 U19.6@2819,-797 U19.6@2819,-797
ESP_EN: C57.2 J12.6 R36.1 U18.3 | length 1241
  Top Layer w15: C57.2@1560,2579 R36.1@1560,2617 ; U18.3@1629.97,2602 1738,2602 1769,2633 v1(1769,2695) ; J12.6@2675.43,2612.3 v1(2675.43,2695)
  Bottom Layer w15: v1(1769,2695) v1(2675.43,2695)
FB_12V: R14.2 R15.1 U6.3
GND: C1.1 C2.1 C3.1 C4.1 C5.1 C6.1 C7.1 C8.1 C9.1 C10.1 C11.1 C12.1 C13.1 C14.1 C15.1 C16.1 C17.1 C18.1 C19.2 C20.1 C21.1 C22.1 C23.2 C24.2 C25.1 C26.1 C27.2 C28.1 C29.1 C30.1 C31.1 C34.1 C35.1 C36.1 C37.1 C38.1 C39.1 C40.1 C41.1 C42.2 C43.2 C44.1 C45.1 C46.1 C47.1 C52.1 C57.1 C58.1 C59.1 C60.1 C62.1 C64.2 C67.2 C68.1 C70.1 C72.1 C73.1 C75.2 C76.1 C77.1 C78.1 C79.1 C80.1 C81.1 C82.1 C83.1 C84.1 C85.1 D1.1 D5.3 D7.1 J1.A1/B12 J1.B1/A12 J2.1 J3.3 J4.19 J4.20 J4.MP1 J4.MP2 J5.2 J6.5 J7.1 J8.1 J9.1 J10.1 J11.1 J12.2 J13.7 LED3.2 LED4.2 P5.1 Q3.2 Q7.2 R1.1 R2.1 R3.1 R4.2 R7.2 R8.2 R10.1 R14.1 R52.1 R66.1 R67.1 RN2.3 RN2.4 RN3.1 RN3.2 RN3.3 RN3.4 SW1.2 SW2.2 U1.2 U2.2 U3.1 U4.1 U4.3 U4.9 U5.1 U6.2 U7.3 U7.8 U8.B U8.F U8.J U9.1 U9.7 U11.11 U12.2 U13.12 U13.18 U13.31 U13.47 U13.63 U18.1 U18.40 U18.41 U19.3 U20.5 U21.2 U22.4 U23.3 U23.9 U23.14 U23.16 U23.19 U23.29 U23.48 X3.2 X3.4 | length 1728
  Top Layer w10: C79.1@1444.68,1381.9 1486.24,1381.9 v1(1503.14,1365) ; U9.1@3765.51,743.01 3765.51,713.86 3771.37,708 C29.1@3823,708 ; C28.1@3823,873 v2(3791.34,873) 3791.34,814.39 3831.22,774.5 U9.7@3860,774.5
  Top Layer w12: v1(2713.46,1754) C34.1@2713.46,1779.47
  Top Layer w20: v1(1495,2578) 1495.5,2578.5 1522.5,2578.5 C57.1@1523,2579
  Signal + GND w20: v1(3472,569) 3412,569 3380,601 3380,767 3403,790 3708.34,790 v2(3791.34,873) v2(3791.34,708)
  Bottom Layer w10: U23.3@1444.68,1394.1 1496.65,1394.1 1505.49,1385.26 1505.49,1367.35 v1(1503.14,1365) ; U23.14@1523.42,1630.32 1523.42,1584.65 v1(1536.8,1571.27) 1555.65,1571.27 1562.79,1578.41 U23.16@1562.79,1630.32
  Bottom Layer w15: v1(2085,-255) 2099,-241 R10.1@2099,-196
  Bottom Layer w20: C2.1@144.12,884 124.12,864 124.12,833 106.12,815 R1.1@106.12,812.5 160.61,812.5 170.47,802.64 v1(171.45,802.64)
  other v1: 1386.39,-970 2482.36,-845.83 1432.07,-716 2551,-623 1233,-575 2425,-196 2213.88,-79.13 797,-51 856.5,-51 916,-51 195,27.36 481.58,27.99 1302,73 709,75 1963,80 535,155.51 1593.94,191 1736,191 2576,224 2685.77,224 2739.08,224 2879,239 3033,239 3086.31,239 2685.77,270.67 2739.08,270.67 2879,285.67 3033,285.67 3086.31,285.67 1894.08,307 2879,332.33 2925.67,332.33 2986.33,332.33 3033,332.33 1109.8,353.27 1318.39,361.01 225,373.45 281,373.45 337.68,372.72 878,385.24 2059,386 281,435.66 337.68,435.66 2899.82,451 146.19,465 146.19,505.54 2059,533.52 146.19,544.91 2860.31,591.5 2059,598.44 2208.58,615 519.69,624.93 657.48,624.93 1554,627 3008,644 1416.05,660.95 1554,669 2980,678 2675.72,681.56 1554,711 1288.18,735.76 286.37,740.78 338,740.78 2365,785 2415,785 3029,856 2721.97,904.3 1099,935 1792.06,937 1837.06,937 3031.18,945 1241,948 1363.62,948 1611.26,970.37 1704.17,970.37 1241,982 1363.62,982 2943.67,1064 1710.09,1091.9 1873.59,1091.9 1979.2,1283.5 1115.64,1338.54 1665,1365 3246,1427 2072,1429.5 3849.65,1439.09 2474.76,1442.43 2517,1443 969.13,1487 1849.02,1502.81 815,1515 1353,1550 1432,1611 1090,1683 626.91,1727.82 1606,1739 1431,1784 1731.18,1790 2308,1863 2308,1906 626.73,1911.86 666.01,1950.87 561.72,1976.61 601.79,2016.95 1490.65,2081.81 2940.15,2170 2940.15,2210 2772.43,2245 1859,2553 1973.46,2553 2517.95,2662 1435,2718.5 1475,2718.5
GPIO9: U13.16 U18.17 | length 2842.4
  Top Layer w12: U18.17@1799.66,2002.79 v1(1799.66,2069.83)
  Signal + 3v3 w12: v1(1335,283) 1335,171 1311,147 1219.88,147 1175.25,191.63 1175.25,1823.1 1232.16,1880 1609.83,1880 v1(1799.66,2069.83)
  Bottom Layer w12: v1(1335,283) 1358.62,306.62 U13.16@1442.36,306.62
GPIO12: R68.2 U18.20 U23.36 | length 1357.6
  Top Layer w13: v1(1823.95,1331) 2026,1331 2092,1265 2133.03,1265 2146.59,1278.56 v1(2146.59,1304.89) ; U18.20@1949.66,2002.79 v1(1949.66,2052)
  Bottom Layer w13: U23.36@1779.32,1354.73 1813.61,1354.73 1821.92,1346.43 1821.92,1333.03 v1(1823.95,1331) 1823.42,1330.47 1823.42,1296.53 R68.2@1822.9,1296 ; v1(1949.66,2052) 1983.46,2018.2 1983.46,1689.54 2146.59,1526.41 v1(2146.59,1304.89)
GPIO13: Q7.1 U18.21 | length 1145.4
  Top Layer w15: U18.21@1999.66,2002.79 v1(1999.66,2052)
  Bottom Layer w15: v1(1999.66,2052) 2017.54,2034.12 2017.54,1732.69 2048.5,1701.73 2362.15,1701.73 2438.6,1625.28 Q7.1@2438.6,1321.37
GPIO16: J4.4 R25.1 U18.9 | length 2439.1
  Top Layer w10: J4.4@2474.76,1784.95 2517.95,1784.95 2527.5,1794.5 R25.1@2555,1794.5
  Top Layer w15: U18.9@1629.97,2302 1582.15,2302 1493.15,2391 1303,2391 1262,2350 1262,1976.47 1309.47,1929 2267,1929 2311.26,1973.26 2557,1973.26 2596,1934.26 2596,1810.54 2579.96,1794.5 R25.1@2555,1794.5
GPIO21: C60.2 R40.1 SW2.1 U18.23 | length 3899.8
  Top Layer w15: v1(1699.66,2102) 1765.54,2167.89 2073.59,2167.89 2099.66,2141.81 U18.23@2099.66,2002.79
  Signal + 3v3 w15: v1(232.34,27.36) 316.87,27.36 420.4,130.9 420.4,731.69 315.6,836.49 315.6,1545.6 435,1665 v1(835,1665)
  Bottom Layer w15: v1(835,1665) 1295,2125 1676.66,2125 v1(1699.66,2102)
GPIO38: U13.17 U18.31 | length 3800.1
  Top Layer w12: v1(1363.62,355.24) 1344.98,336.59 1297.79,336.59 1251.85,382.53 1021.11,382.53 932.44,471.2 932.44,863.44 1277,1208 1277,1673 1350,1746 1552.12,1746 1703.12,1897 v1(1879,1897)
  Top Layer w15: U18.31@2318.95,2252 2470.81,2252 2502.18,2220.63 v1(2502.18,2044.82)
  Bottom Layer w12: v1(1363.62,355.24) U13.17@1363.62,385.36
  Bottom Layer w15: v1(1879,1897) 1863,1913 1863,2069.94 1905.06,2112 2435,2112 v1(2502.18,2044.82)
GPIO39: J5.3 Q4.1 R24.1 U18.32 | length 6034.6
  Top Layer w15: Q4.1@2127.98,-720.63 2128.29,-720.31 2164.69,-720.31 v1(2165,-720) ; U18.32@2318.95,2302 2586.16,2302 2610.31,2326.15 2981.33,2326.15 3050,2257.48 v1(3050,2159) 3089.75,2198.75 3266,2198.75 3905.91,1558.84 3905.91,1411.61 3877.62,1383.32 R24.1@3874.12,1383.32 J5.3@3765.09,1383.32
  Bottom Layer w15: v1(2165,-720) 2664.41,-720 3235.94,-148.47 3235.94,594.08 3114.53,715.49 3114.53,2094.47 v1(3050,2159)
GPIO40: J5.4 J6.2 P11.1 U18.33 | length 2648.8
  Top Layer w15: U18.33@2318.95,2352 3016.29,2352 v1(3071.5,2296.79) ; J6.2@3171.85,1250.45 3172.34,1250.94 v1(3550.94,1250.94) 3634.11,1334.11 J5.4@3765.09,1334.11
  Bottom Layer w15: v1(3071.5,2296.79) 3460,1908.29 v1(3460,1620) 3460,1340 3549.06,1250.94 v1(3550.94,1250.94)
GPIO41: J5.5 J6.3 P12.1 U18.34 | length 2732.7
  Top Layer w15: U18.34@2318.95,2402 3007,2402 v1(3064,2345) ; J6.3@3171.85,1309.5 3550.39,1309.5 v1(3575,1334.11) ; P12.1@3461,1715 v1(3575,1715) ; v1(3667,1284.89) J5.5@3765.09,1284.89
  Bottom Layer w15: v1@3064,2341 v1(3064,2345) 3575,1834 v1(3575,1715) v1(3575,1334.11) ; v1@3575.21,1333.9 3624.21,1284.89 v1(3667,1284.89)
GPIO42: J5.6 R23.1 U18.35 | length 2289.4
  Top Layer w15: U18.35@2318.95,2452 2998.15,2452 v1(3124,2326.15) ; J5.6@3765.09,1235.68 R23.1@3819,1235.68 v1(3819,1284.89)
  Bottom Layer w15: v1(3124,2326.15) 3819,1631.15 v1(3819,1284.89)
GPIO47: Q5.2 R39.1 R41.2 U18.24 | length 79.1
  Top Layer w15: v1(2149.66,1960.17) U18.24@2149.66,2002.79
  Bottom Layer w15: v1(2149.66,1960.17) 2150,1959.83 2150,1924.34 R41.2@2150.34,1924
HTS: Q4.3 R16.1 R17.2 R18.2 R19.2 | length 1338.6
  Top Layer w20: Q4.3@2049.24,-683.23 2049.24,-575.42 2078.87,-545.79 2284.08,-545.79 2309.98,-571.69 R17.2@2309.98,-645.83 ; R18.2@2249.98,-895.83 2212.49,-895.83 2190,-873.34 ; R19.2@2367.36,-645.83 R17.2@2309.98,-645.83 ; R16.1@2467.36,-1044.83 2223.02,-1044.83 2190,-1011.8 2190,-873.34 ; 2190,-873.34 2190,-760.49 2213.72,-736.77 2281.18,-736.77 2309.98,-707.98 R17.2@2309.98,-645.83
IND_LED: R28.1 U13.20 | length 556.1
  Top Layer w15: R28.1@1015.19,345.87 1053.19,345.87 1086.11,312.95 1368.49,312.95 v1(1410.77,355.24)
  Bottom Layer w10: U13.20@1363.62,444.42 1398.88,444.42 1410.77,432.53 v1(1410.77,355.24)
IO0: J12.5 U18.27 | length 747.4
  Top Layer w15: U18.27@2318.95,2052 2414.14,2052 2439,2076.86 v1(2439,2152) ; v1(2636.06,2560) J12.5@2636.06,2612.3
  Signal + GND w15: v1(2439,2152) 2439,2177 2636.06,2374.06 v1(2636.06,2560)
LED_DIN: J4.3 R43.2 | length 270.4
  Top Layer w10: v1(2380,1771.17) 2380,1794.5 2390.14,1804.64 J4.3@2474.76,1804.64
  Bottom Layer w15: R43.2@2232,1771.46 2232.14,1771.32 2379.86,1771.32 v1(2380,1771.17)
MIC_CLK: C38.2 J4.8 R29.2 | length 3017.1
  Top Layer w12: J4.8@2474.76,1706.21 2538.41,1706.21 v1(2564,1731.8)
  Signal + 3v3 w13: v1(1240,186) 1199.67,226.33 1199.67,1126.67 1265.08,1192.08 2337.08,1192.08 2390,1245 2390,1704 2417.8,1731.8 v1(2564,1731.8)
  Bottom Layer w13: C38.2@1240,110 R29.2@1240,158 v1(1240,186)
MIC_CLK_MCU: R29.1 SB1.2 SB2.2 | length 835.2
  Signal + 3v3 w12: v1(1299,186) 1299,304.37 1315.63,321 1421.14,321 1455.28,355.14 1457,355.14 v1(1456.14,356)
  Bottom Layer w12: SB2.2@1299,214.87 v1(1299,186) 1299.5,185.5 1299.5,158.5 R29.1@1300,158 ; SB1.2@1425.05,810 1425.05,786.66 1410,771.61 1410,711.58 1456.14,665.44 v1(1456.14,356)
MIC_PDM12: J4.9 U13.36 | length 1841.4
  Top Layer w12: v1(2422,1686.53) J4.9@2474.76,1686.53
  Signal + 3v3 w12: v1(1501.42,968.31) 1501.42,1131.89 1535.79,1166.27 2355.45,1166.27 2422,1232.82 v1(2422,1686.53)
  Bottom Layer w10: U13.36@1501.42,759.38 v1(1501.42,968.31)
MIC_PDM34: J4.10 U13.23 | length 3609.7
  Top Layer w12: J4.10@2474.76,1666.84 2541.84,1666.84 v1(2564,1689)
  Bottom Layer w12: U13.23@1363.62,503.47 1157.82,503.47 1061.75,407.4 917.54,407.4 868.52,456.43 868.52,875.92 1007.79,1015.2 2139.18,1015.2 2237.37,917 2514,917 2564,967 v1(2564,1689)
NetC4_2: C4.2 C5.2 L1.2 U1.1 U1.3
NetC6_2: C6.2 C7.2 FB1.2 U2.1 U2.3
NetC8_2: C8.2 F1.2 FB2.1
NetC39_2: C39.2 U12.3
NetC52_2: C52.2 U13.30 | length 168.6
  Bottom Layer w8: C52.2@1220,580.95 1270,580.95 1330.32,641.27 U13.30@1363.62,641.27
NetC62_2: "J13.Shield 1" "J13.Shield 2" C62.2 | length 745.1
  Bottom Layer w30: 527.71,886.02 527.71,1495.87 544.57,1512.73 652.73,1512.73 C62.2@655,1515
NetC64_1: C64.1 J13.4 R50.1 | length 456.6
  Top Layer w10: J13.4@657.63,1265.95 606.72,1215.03 606.72,1136.31 629.35,1113.68 679.7,1113.68 730.66,1164.64 834.86,1164.64 866.5,1133 C64.1@869,1133
NetC65_2: C65.2 R53.2 R61.1 | length 187.7
  Bottom Layer w9: C65.2@1116,1378 1197.5,1378 1215,1395.5 R53.2@1215,1425 R61.1@1267,1425
NetC66_2: C66.2 R51.2 R62.1 | length 186.4
  Bottom Layer w9: C66.2@1116,1425 R51.2@1168,1425 1168,1449.01 1173.99,1455 1251.5,1455 1267,1470.5 R62.1@1267,1473
NetC68_2: C68.2 J13.5 R51.1 R53.1 | length 706.5
  Bottom Layer w15: J13.5@757.63,1215.95 839.94,1215.95 870.93,1246.93 870.93,1488.89 915.04,1533 C68.2@1191.04,1533
NetC69_1: C69.1 Q6.1 R55.2 R57.1
NetC70_2: C70.2 FB9.1 Q6.3
NetC71_1: C71.1 D7.2 L3.1 U22.1 | length 64.1
  Top Layer w20: C71.1@1800,492.14 U22.1@1864.08,492.14
NetC71_2: C71.2 R60.1 | length 92.6
  Top Layer w20: C71.2@1800,552.14 R60.1@1800,644.74
NetC74_1: C74.1 R65.1 R66.2 U22.5 | length 353.7
  Top Layer w20: U22.5@2014.08,704.74 2063.26,704.74 2094.79,673.21 2094.79,545.21 2121.48,518.52 R66.2@2208.58,518.52 ; 2245.61,494.52 2250.61,499.52
NetC74_2: C74.2 C75.1 F2.1 L3.2 R65.2
NetC76_2: C76.2 U23.22 | length 115.9
  Bottom Layer w10: U23.22@1680.9,1630.32 1680.9,1686.61 1694.28,1700 C76.2@1735,1700
NetC78_2: C78.2 U23.20 | length 200.3
  Bottom Layer w10: C78.2@1641.39,1830.55 1641.53,1830.41 U23.20@1641.53,1630.32
NetC80_2: C80.2 R70.1 U23.30 X3.1 | length 182.8
  Bottom Layer w13: U23.30@1779.32,1472.84 1868.74,1472.84
  Bottom Layer w20: 1868.74,1472.84 1896.93,1472.84 1913.49,1456.29 R70.1@1913.49,1414.5
NetC85_2: C85.2 R70.2 U23.31 X3.3 | length 496.8
  Bottom Layer w10: U23.31@1779.32,1453.16 1860.8,1453.16 1880.49,1433.47 1880.49,1362.91 1888.9,1354.5 R70.2@1913.49,1354.5
  Bottom Layer w20: R70.2@1913.49,1354.5 1913.49,1265.42 1933.2,1245.71 2021.61,1245.71 2039.2,1263.3 C85.2@2039.2,1313.5
NetD8_2: D8.2 F2.2
NetJ1_A5: J1.A5 R3.2 | length 196
  Top Layer w13: J1.A5@233.13,637.43 v1(323.92,637.43)
  Bottom Layer w13: R3.2@233,672 289.35,672 v1(323.92,637.43)
NetJ1_B5: J1.B5 R2.2 | length 125.6
  Top Layer w14: J1.B5@233.13,519.32 281.3,519.32 291.19,529.21 v1(293.79,529.21)
  Bottom Layer w14: R2.2@233,529.21 v1(293.79,529.21)
NetJ3_5: J3.5 SB6.2 | length 104.8
  Top Layer w15: SB6.2@1024.79,-510.46 1045.2,-510.46 1058.25,-497.4 J3.5@1058.25,-431.5
NetJ3_6: J3.6 SB5.2 | length 164.9
  Top Layer w15: v1(944.08,-510.46) SB5.2@985,-510.46 ; v1(1008.79,-476.6) 1008.91,-476.47 1008.91,-431.62 J3.6@1009.04,-431.5
  Bottom Layer w15: v1(944.08,-510.46) 974.93,-510.46 v1(1008.79,-476.6)
NetJ10_2: J10.2 R30.1 | length 70.5
  Top Layer w20: J10.2@553.88,-471.88 R30.1@603.71,-422.05
NetJ11_2: J11.2 R31.1 | length 70.5
  Top Layer w20: J11.2@332.46,-250.46 R31.1@382.29,-200.63
NetJ13_12: J13.12 R48.1 | length 2265.5
  Bottom Layer w15: J13.12@247,1351.77 315,1419.77 315,1558.63 350.45,1594.09 1196.98,1594.09 1247.82,1644.93 1247.82,1874.9 1281.15,1908.23 1749.82,1908.23 1844.33,1813.72 R48.1@1844.33,1631.27
NetJ13_14: J13.14 R49.1 | length 2967.4
  Bottom Layer w15: J13.14@247,930.12 120,1057.12 120,1540 200.96,1620.96 1182.66,1620.96 1216.53,1654.84 1216.53,1888.98 1262.55,1935 1767,1935 1895.99,1806.01 R49.1@1895.99,1631.27
NetL2_1: L2.1 R12.2 SW3.1 U6.5
  other v1: 327.71,152.59 327.71,185.28 327.71,217.97 327.71,250.67
NetLED1_2: LED1.2 R5.1 | length 237.1
  Top Layer w15: LED1.2@297.18,1756.38 297.18,1758.66 317.07,1778.55 v1(317.07,1812.31)
  Bottom Layer w15: v1(317.07,1812.31) 317.07,1812.21 393.1,1736.18 422.67,1736.18 R5.1@447.97,1761.48
NetLED2_2: LED2.2 R6.1 | length 123.6
  Top Layer w15: LED2.2@375.3,1834.26 v1(404,1863)
  Bottom Layer w15: v1(404,1863) 389.1,1848.1 389.1,1819.42 R6.1@412.61,1795.9
NetLED3_1: LED3.1 R28.2 | length 41.2
  Top Layer w18: LED3.1@936.99,345.87 R28.2@978.19,345.87
NetLED4_1: LED4.1 R39.2 | length 339.6
  Top Layer w20: LED4.1@2049.66,1897 v1(2049.66,1820.19) 2049.75,1820.28 2270.45,1820.28 v1(2270.54,1820.37) ; v1@2050.64,1821.17 2050.35,1821.46 2050.35,1821.86 v1@2050.64,1822.15
  Bottom Layer w20: R39.2@2229.94,1820.37 v1(2270.54,1820.37)
NetP20_1: P20.1 R56.1 U22.7 | length 198.9
  Top Layer w15: P20.1@1837.06,841 R56.1@1837.06,779.21 1889.46,779.21 1914.08,754.59 U22.7@1914.08,704.74
NetQ3_1: Q3.1 R11.1 | length 34.4
  Bottom Layer w20: R11.1@315.75,-7 Q3.1@315.75,27.36
NetQ3_3: Q3.3 R12.1 U6.4
NetQ5_3: Q5.3 R42.2 R43.1
NetQ7_3: Q7.3 R57.2
NetR5_2: R5.2 U4.6 | length 86.4
  Bottom Layer w20: R5.2@490.4,1803.91 490.4,1804.42 550.81,1864.83 U4.6@550.81,1865.34
NetR6_2: R6.2 U4.7 | length 87.4
  Bottom Layer w20: R6.2@455.04,1838.33 455.04,1839.31 515.45,1899.72 U4.7@515.45,1900.69
NetR7_1: R7.1 U4.2 | length 137.1
  Bottom Layer w15: R7.1@639.03,2153.47 641.5,2150.99 R7.1@643.62,2150.99 ; U4.2@677.39,2062.63 677.39,2065.25 701.11,2088.97 701.11,2107.23 656.7,2151.64 R7.1@644.27,2151.64 ; R7.1@643.62,2150.99 R7.1@644.27,2151.64 ; R7.1@643.62,2150.99 R7.1@644.27,2151.64
NetR9_1: R9.1 R10.2 U5.4
NetR16_2: R16.2 U8.E U8.G | length 451.2
  Top Layer w13: R16.2@2527.36,-1044.83 2624.25,-1044.83 2652.5,-1016.58 2652.5,-876.5 2621.82,-845.83 U8.G@2563.98,-845.83
  Top Layer w20: R16.2@2527.36,-1044.83 U8.E@2527.36,-971.81
NetR18_1: R18.1 U8.C | length 80.8
  Top Layer w20: R18.1@2309.98,-895.83 U8.C@2390.75,-895.83
NetR19_1: R19.1 U8.K | length 74
  Top Layer w20: U8.K@2427.36,-719.84 R19.1@2427.36,-645.83
NetR26_1: R26.1 U11.10 | length 380.7
  Top Layer w13: R26.1@2653,2015 2898.38,2015 2933.06,1980.33 U11.10@2933.06,1894.09
NetR45_2: R45.2 U20.1
NetR46_1: R46.1 U20.3 | length 574.6
  Top Layer w15: R46.1@1168,631.57 1168,607.61 1179.82,595.79 1350.08,595.79 1400.64,545.23 1400.64,411.64 1384.69,395.68 1331.93,395.68 1316.19,411.43 U20.3@1316.19,472.4
NetR47_2: R47.2 U20.2
NetR48_2: R48.2 U23.25 | length 65
  Bottom Layer w10: U23.25@1779.32,1571.27 R48.2@1844.33,1571.27
NetR49_2: R49.2 U23.27 | length 148.7
  Bottom Layer w10: U23.27@1779.32,1531.9 1883.55,1531.9 1895.99,1544.34 R49.2@1895.99,1571.27
NetR54_1: R54.1 U22.2 U22.9
  other v1: 1894.08,567.14 1984.08,567.14 1939.08,598.44 1894.08,626.28 1984.08,627.14
NetR60_2: R60.2 U22.8 | length 64.1
  Top Layer w20: R60.2@1800,704.74 U22.8@1864.08,704.74
NetR61_2: R61.2 U23.5 | length 129
  Bottom Layer w10: R61.2@1327,1425 1327,1427.5 1340.73,1441.23 1401.32,1441.23 1409.15,1433.4 U23.5@1444.61,1433.4
NetR62_2: R62.2 U23.6 | length 127.4
  Bottom Layer w10: R62.2@1327,1473 1327,1470.5 1337,1460.5 1406.53,1460.5 1412.57,1454.46 1443.38,1454.46 U23.6@1444.68,1453.16
NetR63_2: R63.2 U23.1 | length 138.3
  Bottom Layer w10: R63.2@1327,1305 1362.03,1305 1410.46,1353.43 1443.38,1353.43 U23.1@1444.68,1354.73